# Altium PCB NB2DSK01.PcbDoc (part 6 of 17)
Units mil, origin at the board's own origin, x right, y up, seen from the top; angles counter-clockwise.
Board outline 11815 x 6500.03 mil, 8 copper layers (Top Layer, MidLayer1, MidLayer2, GND, PWR, MidLayer3, MidLayer4, Bottom Layer), stack 74.62 mil thick; 798 components, 1002 nets, 3927 pads, 3182 vias.
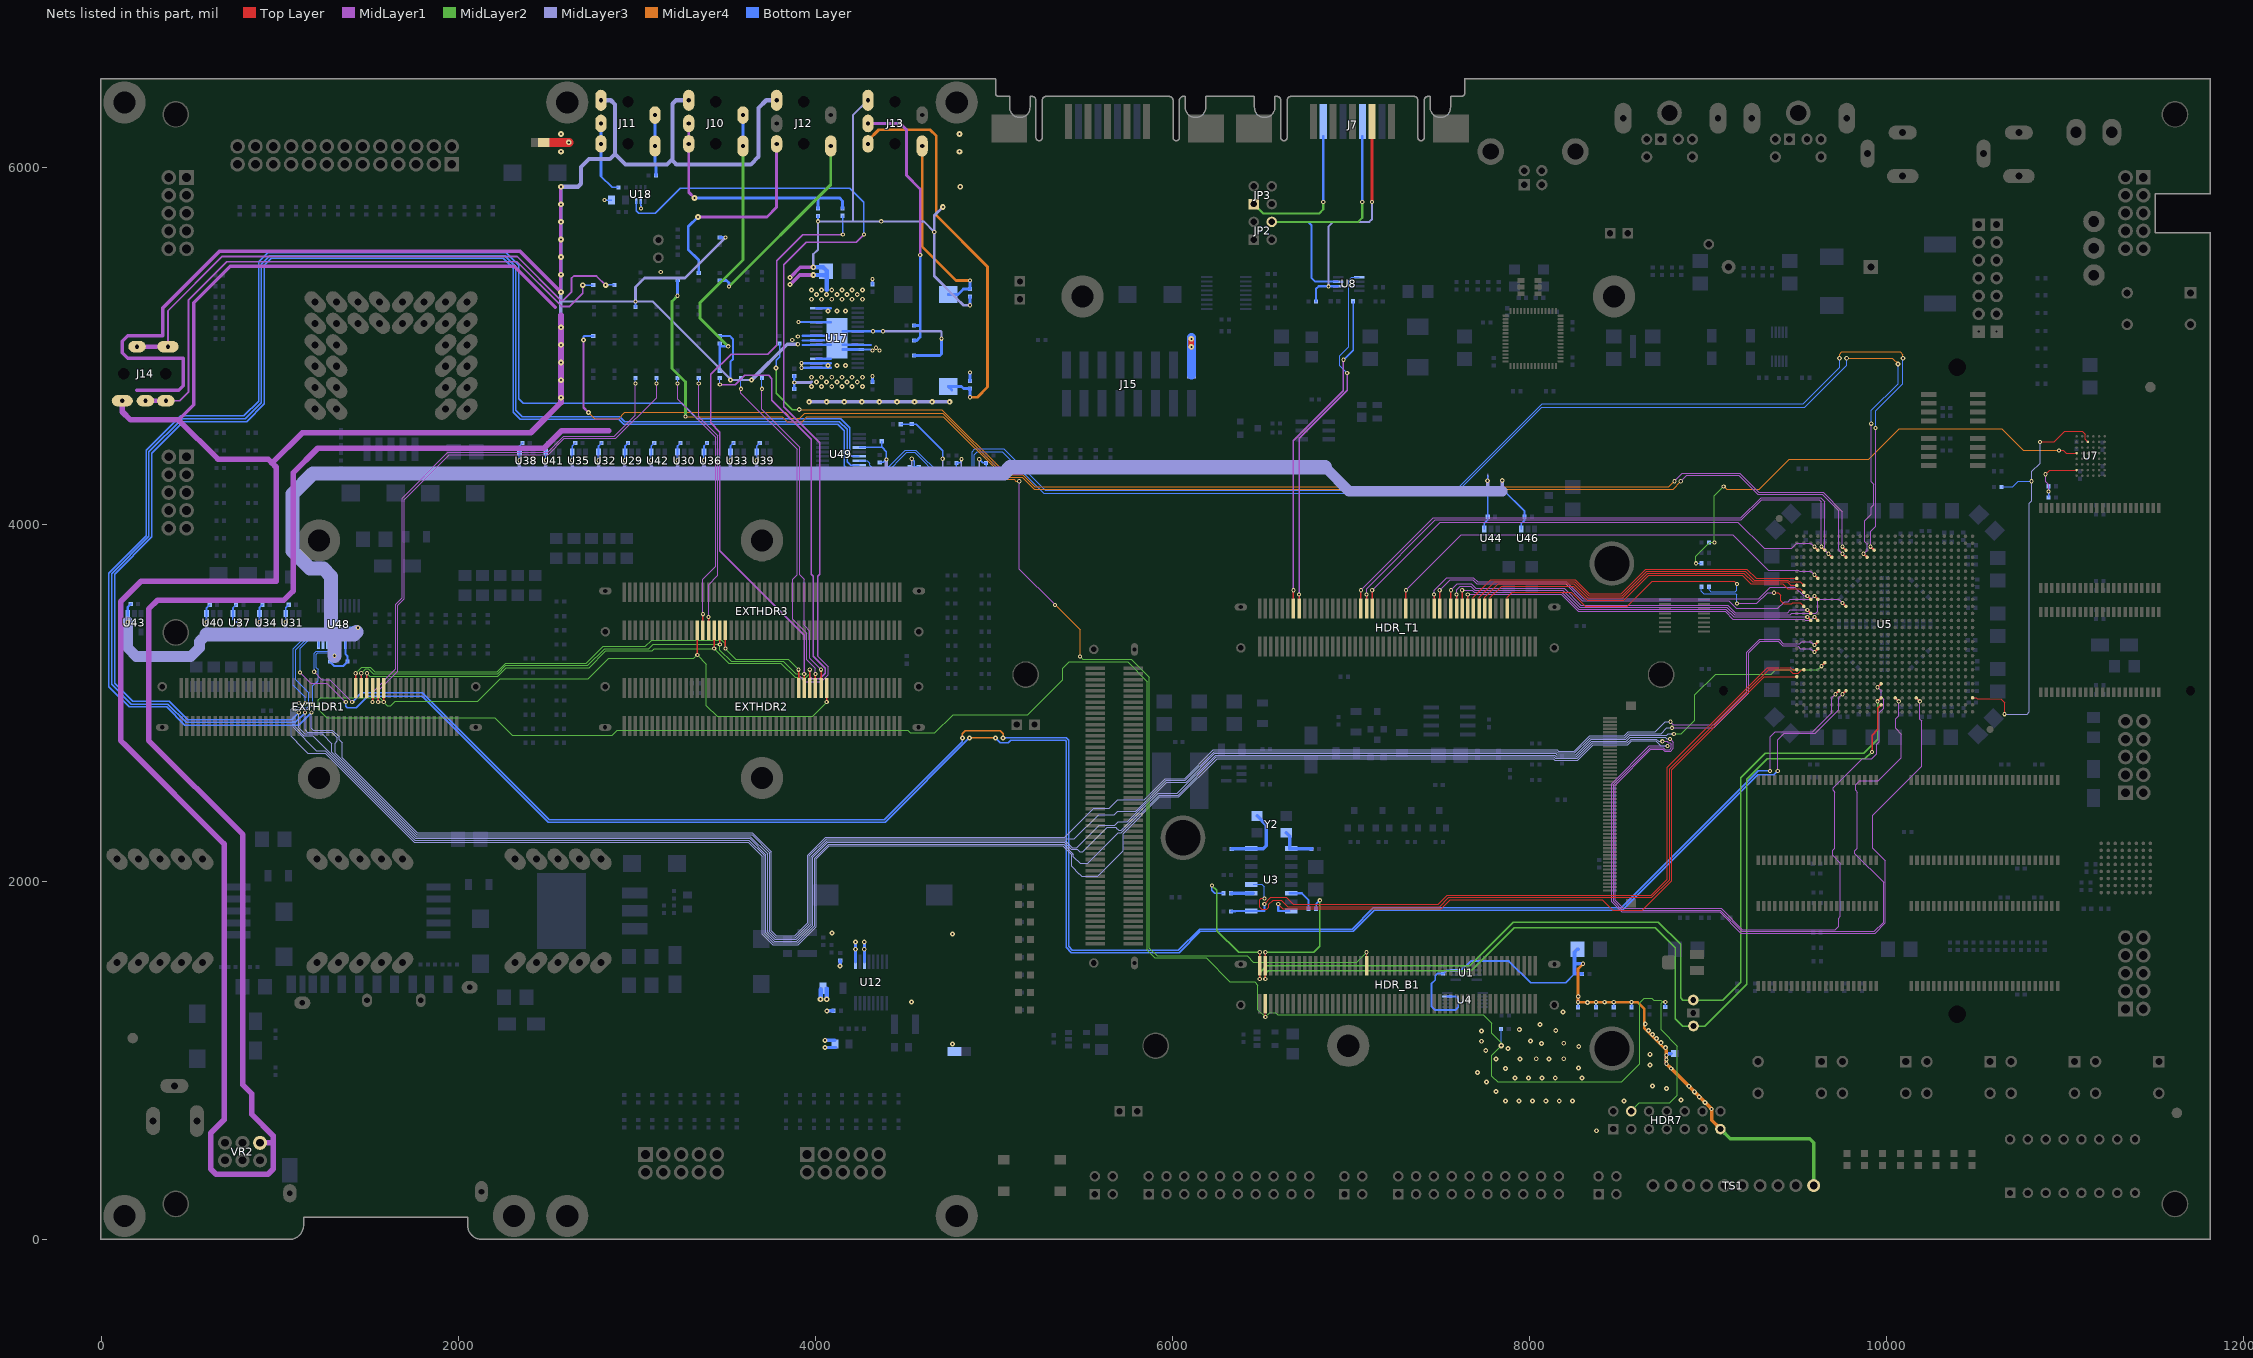
[diagram p12: the nets of this part, all layers, seen from the top]

## Via types
v1: diameter 23.62, hole 11.81, Top Layer to Bottom Layer, tented both sides, 1950 vias
v2: diameter 27.56, hole 11.81, Top Layer to Bottom Layer, tented both sides, 679 vias
v3: diameter 23.62, hole 11.81, Top Layer to Bottom Layer, 194 vias
v4: diameter 31.5, hole 11.81, Top Layer to Bottom Layer, tented both sides, 178 vias
v5: diameter 21.65, hole 11.81, Top Layer to Bottom Layer, tented both sides, 67 vias
v6: diameter 23.62, hole 11.81, Top Layer to Bottom Layer, tented bottom, 53 vias
v7: diameter 26, hole 11.81, Top Layer to Bottom Layer, tented both sides, 21 vias
v8: diameter 26, hole 11.81, Top Layer to Bottom Layer, 13 vias
v9: diameter 28, hole 11.81, Top Layer to Bottom Layer, 8 vias
v10: diameter 25.59, hole 11.81, Top Layer to Bottom Layer, tented both sides, 7 vias
v11: diameter 39.37, hole 11.81, Top Layer to Bottom Layer, tented both sides, 5 vias
v12: diameter 30, hole 11.81, Top Layer to Bottom Layer, 3 vias
v13: diameter 30, hole 11.81, Top Layer to Bottom Layer, tented both sides, 2 vias
v14: diameter 23, hole 11.81, Top Layer to Bottom Layer, tented both sides, 1 vias
v15: diameter 26.56, hole 11.81, Top Layer to Bottom Layer, tented both sides, 1 vias

## Nets (pads, with @x,y where several pads share a name; then routed paths per layer and width w, separated by ;. In a path a pad name is that pad's centre, name@x,y a point inside that pad or via, vN(x,y) a via of type N, cw(c..) or ccw(c..) an arc to the next point about the centre after c; other vN are vias at no path point) (continued)
AD.I2C.SDA: EXTHDR1.27 EXTHDR2.27 EXTHDR3.27 HDR7.4 HDR_B1.3 R7.2 R9.1 | length 15096.9
  Top Layer w5: v1(6519.68,1244.1) HDR_B1.3@6519.68,1318.9
  Top Layer w7.87: v1(1582.68,3007.87) EXTHDR1.27@1582.68,3086.61 ; v1(3338.58,3271.65) EXTHDR3.27@3338.58,3409.45 ; v1(4062.99,3007.87) EXTHDR2.27@4062.99,3086.61
  MidLayer2 w5: v1(4062.99,3007.87) 3984.25,2929.13 3448.82,2929.13 3389.76,2988.19 3389.76,3220.47 v1(3338.58,3271.65) 3318.9,3251.97 2842.52,3251.97 2728.35,3137.8 2236.22,3137.8 2110.24,3011.81 1645.67,3011.81 1622.05,2988.19 1602.36,2988.19 1559.06,3031.5 1228.35,3031.5 1216.54,3019.69 1216.54,2968.5 1264.59,2920.45 2204.68,2920.45 2302.3,2822.84 2862.2,2822.84 2889.76,2850.39 4515.75,2850.39 4531.5,2834.65 4669.29,2834.65 4771.65,2937.01 5188.98,2937.01 5385.83,3133.86 5385.83,3196.85 5421.26,3232.28 5748.03,3232.28 5858.27,3122.05 5858.27,1618.11 5901.58,1574.8 6188.98,1574.8 6321.73,1442.05 6459.52,1442.05 6478.46,1423.11 6478.46,1285.32 v1(6519.68,1244.1) 6543.31,1267.72 6578.74,1267.72 6590.55,1255.91 7738.8,1255.91 7787,1207.71 7787,1154.07 7840.64,1100.43 v4(7840.64,1083.36) ; v4@7840.64,1082 7787,1028.36 7787,913.14 7820.06,880.08 8515.54,880.08 8617,981.54 8617,1324 8642,1349 8684,1349 8694.94,1338.06 8734.08,1338.06 8744.08,1328.06 ; HDR7.4@8568.5,716.54 8614.97,763 8784,763 8826,805 8826,1081.14 8736,1171.14 8736,1319.99 8744.08,1328.06 ; v1(8759.97,1328.06) 8744.08,1328.06
  Bottom Layer w5: v4(7840.64,1083.36) R9.1@7840.64,1177
  Bottom Layer w7.87: R7.2@8759.97,1299.22 v1(8759.97,1328.06)
ADC_GND: C5.2 C6.2 C7.2 C8.2 C9.2 C16.2 C17.2 HDR7.13 NT2.2 TS1.10 U1.7 U4.4 | length 4035.1
  MidLayer2 w19.68: HDR7.13@9068.5,616.54 9123.71,561.33 9568.81,561.33 9590.67,539.47 TS1.10@9590.67,300
  MidLayer4 w15: v1(8299,1542) 8270.97,1513.97 v1(8270.97,1327.04) v1(8370.97,1327.04) v1(8420,1327.04) v1(8470.97,1327.04) v1(8570.97,1327.04) 8602.96,1327.04 8642,1288 8642,1180.22 8765.75,1056.48
  MidLayer4 w19.68: v1(8766,982) v1(8792.43,955.57) v1(9019,729) 9019,666.04 HDR7.13@9068.5,616.54
  MidLayer4 w20: v1@8765.75,982.28 v1(8765.75,1005) v1(8765.75,1030) 8765.75,1056.48
  Bottom Layer w7.87: C5.2@8270.97,1298.19 v1(8270.97,1327.04) ; C6.2@8370.97,1298.19 v1(8370.97,1327.04) ; C7.2@8470.97,1298.19 v1(8470.97,1327.04) ; C8.2@8570.97,1298.19 v1(8570.97,1327.04)
  Bottom Layer w9.84: U4.4@7539.38,1359.06 7585.94,1359.06 7600,1345 7600,1299.34 7583.33,1282.67 7471,1282.67 7450,1303.67 7450,1429.71 7471.31,1451.02 7471.31,1475.45 7483,1487.14 C9.2@7514.54,1487.14 7517.5,1487.14 7535.21,1504.86 U1.7@7586.54,1504.86 7617.86,1504.86 7670,1557 7883.89,1557 8005.41,1435.48 8201.48,1435.48 8251.2,1485.2 ; 8791,1039 NT2.2@8797,1039
  Bottom Layer w19.68: C16.2@8270.89,1623 C16.2@8266.95,1623 8251.2,1607.25 8251.2,1542 ; C17.2@8293.53,1485.2 8251.2,1485.2 8251.2,1542 ; v1(8299,1542) 8251.2,1542
  Bottom Layer w20: v1(8766,982) 8766,1005 8766,1030 8766,1031 8774,1039 8791,1039
  other v2: 8374,607 8982,766 7864.78,773.4 7939.99,773.4 8015.2,773.4 8090.41,773.4 8165.62,773.4 8240.83,773.4 8527.72,773.4 8847,778 8950,796 8923,825 7811.6,826.58 8766,844 8892,856 8687,857 7758.42,879.76 7917.95,902 7993.16,902 8068.37,902 8143.58,902 8294,902 7709,934 7864.77,955.18 8274.22,957.78 8675,975 7811.59,1008.36 7945,1009 8108,1009 8037,1010 8191,1010 8673,1035 7754,1057 7879,1068 8761,1072 8275,1079 8067,1096 8191,1097 8735,1100 7729.76,1108 8005,1110 8711,1123 8688,1147 7729.76,1166.57 8146,1169 8665,1169 7942,1174 8058,1202 8186,1273 8324,1326 8272,1359
  other v15: 8648,1205
AGND: C151.2 C152.1 NT1.1 R69.1 R70.1 U12.9 U12.11 | length 517.6
  Bottom Layer w18: v2(4053.68,1073.45) 4110.31,1073.45 C152.1@4113.68,1073.45 ; v2(4053.68,1113.45) C152.1@4108.68,1113.45 ; v2(4063.68,1278.45) R69.1@4100.5,1278.45 ; v2(4138.68,1528.45) R70.1@4138.68,1560.27 ; U12.9@4224.18,1553.45 4224.18,1623.45 v2@4224.18,1662.95 ; U12.11@4274.18,1553.45 4274.18,1623.45 v2@4274.18,1662.95
  Bottom Layer w25: v4(4028.68,1343.45) C151.2@4028.68,1398.45 ; v4(4063.68,1343.45) 4063.68,1403.45
  other v2: 4768.68,1093.45 4538.68,1328.45 4223.68,1623.45 4273.68,1623.45 4223.68,1663.45 4273.68,1663.45 4768.68,1708.45 4093.68,1713.45
AIN.L: C175.2 EXTHDR3.31 | length 1481.6
  Top Layer w7.87: EXTHDR3.31@3401.57,3409.45 v1(3401.57,3484.25) v1@3401.57,3488.19
  MidLayer1 w5: v1(3346.46,4791.34) 3346.46,4606.3 3452.76,4500 3452.76,3716.54 3401.57,3665.36 v1(3401.57,3484.25)
  Bottom Layer w5: v1(3346.46,4791.34) C175.2@3346.46,4821.85
AIN.R: C185.2 EXTHDR3.29 | length 1529.8
  Top Layer w7.87: EXTHDR3.29@3370.08,3409.45 v1(3370.08,3500)
  MidLayer1 w5: v1(3228.35,4791.34) 3228.35,4704.72 3440.94,4492.13 3440.94,3767.72 3370.08,3696.85 3370.08,3633.86 v1(3370.08,3500)
  Bottom Layer w5: v1(3228.35,4791.34) C185.2@3228.35,4821.85
AOUT_HOST.L: R108.1 U5.D8 | length 8117.3
  Top Layer w7.87: v1(9751.97,3838.58) U5.D8@9771.65,3818.9
  MidLayer1 w5: v1(8846.46,4244.1) 8880.81,4278.45 9170.37,4278.45 9276.82,4172 9639.43,4172 9732.28,4079.14 9732.28,3858.27 v1(9751.97,3838.58)
  MidLayer1 w11.81: v2(2700.79,5035.43) 2700.79,4657.48 v2(2728.35,4629.92)
  MidLayer4 w5: v2(2728.35,4629.92) 2763.78,4594.49 2897.64,4594.49 2933.07,4629.92 3830.71,4629.92 3862.2,4598.43 3913.39,4598.43 3940.95,4625.99 4712.6,4625.99 5070.87,4267.72 5157.48,4267.72 5224.41,4200.79 8803.15,4200.79 v1(8846.46,4244.1)
  Bottom Layer w11.81: v2(2700.79,5035.43) 2700.79,5053.36 2706.01,5058.58 R108.1@2755.91,5058.58
AOUT_HOST.R: R128.1 U5.C8 | length 6821.4
  Top Layer w7.87: v1(9751.97,3877.95) U5.C8@9771.65,3858.27
  MidLayer1 w5: v1(8811.02,4244.1) 8855.38,4288.45 9176.68,4288.45 9209.23,4255.91 9240.16,4224.98 9283.13,4182 9643.57,4182 9751.97,4073.6 v1(9751.97,3877.95)
  MidLayer2 w7.87: v2(3779.53,4877.95) 3779.53,4736.22 3870.08,4645.67 v2(3909.45,4645.67)
  MidLayer4 w5: v2(3909.45,4645.67) 4708.66,4645.67 5074.8,4279.53 5161.42,4279.53 5228.35,4212.6 8779.53,4212.6 v1(8811.02,4244.1)
  Bottom Layer w7.87: v2(3779.53,4877.95) 3779.53,4921.26 3799.21,4940.95 R128.1@3799.21,5016.22
AOUTA.L: C173.2 EXTHDR1.31 | length 2996.2
  Top Layer w7.87: v1(1519.69,3007.87) EXTHDR1.31@1519.69,3086.61
  MidLayer1 w5: v1(1519.69,3007.87) 1519.69,3062.99 1649.61,3192.91 1649.61,3555.12 1685.04,3590.55 1685.04,4149.61 1940.94,4405.51 2500,4405.51 2590.55,4496.06 2874.02,4496.06 2992.13,4614.17 v1(2992.13,4791.34)
  Bottom Layer w5: v1(2992.13,4791.34) C173.2@2992.13,4821.85
AOUTA.R: C184.2 EXTHDR1.29 | length 3032
  Top Layer w7.87: v1(1551.18,3007.87) EXTHDR1.29@1551.18,3086.61
  MidLayer1 w5: v1(1551.18,3007.87) 1551.18,3070.87 1661.42,3181.1 1661.42,3551.18 1696.85,3586.61 1696.85,4141.73 1948.82,4393.7 2503.94,4393.7 2594.49,4484.25 2881.89,4484.25 3110.24,4712.6 v1(3110.24,4791.34)
  Bottom Layer w5: v1(3110.24,4791.34) C184.2@3110.24,4821.85
AOUTB.L: C176.2 EXTHDR2.31 | length 1927.7
  Top Layer w7.87: EXTHDR2.31@4000,3086.61 v1(4000,3165.36)
  MidLayer1 w5: v1(3582.68,4761.81) 3582.68,4737.88 3897.64,4422.92 3897.64,3720.47 3874.02,3696.85 3874.02,3472.44 3952.76,3393.7 3952.76,3244.1 4000,3196.85 v1(4000,3165.36)
  Bottom Layer w5: v1(3582.68,4761.81) C176.2@3582.68,4821.85
AOUTB.R: C186.2 EXTHDR2.29 | length 1873.2
  Top Layer w7.87: EXTHDR2.29@4031.5,3086.61 v1(4031.5,3188.98)
  MidLayer1 w5: v1(3700.79,4761.81) 3700.79,4647.35 3913.39,4434.75 3913.39,3720.47 3937.01,3696.85 3937.01,3437.01 3968.5,3405.51 3968.5,3251.97 v1(4031.5,3188.98)
  Bottom Layer w5: v1(3700.79,4761.81) C186.2@3700.79,4821.85 C186.2@3700.79,4822.84
AOUTC.L: C192.2 EXTHDR1.33 EXTHDR2.33 EXTHDR3.33 | length 5210.3
  Top Layer w7.87: EXTHDR1.33@1488.19,3086.61 v1(1488.19,3169.29) ; v1(3433.07,3307.09) EXTHDR3.33@3433.07,3409.45 ; EXTHDR2.33@3968.5,3086.61 v1(3968.51,3188.98)
  MidLayer1 w5: 3755.8,4698.93 3755.91,4699.04
  MidLayer1 w7.87: v1(3464.57,4785.43) 3551.6,4785.43 3602.87,4836.7 3737.9,4836.7 3755.91,4818.69 3755.91,4699.06 ; 3755.8,4698.93 3976.38,4478.35 3976.38,3724.41 3988.19,3712.6 3988.19,3263.78 4055.12,3196.85 4055.12,3169.29 4023.62,3137.8 3980.32,3137.8 3968.5,3149.61 v1(3968.51,3188.98)
  MidLayer2 w5: v1(1488.19,3169.29) 1503.94,3153.54 2222.08,3153.54 2269.32,3200.79 2732.28,3200.79 2826.77,3295.28 3086.61,3295.28 3098.42,3307.09 v1(3433.07,3307.09) 3515.75,3224.41 3807.09,3224.41 3885.83,3145.67 3948.82,3145.67 3968.51,3165.36 v1(3968.51,3188.98)
  Bottom Layer w5: v1(3464.57,4785.43) C192.2@3464.57,4821.85
AOUTC.MIC: EXTHDR1.37 EXTHDR2.37 EXTHDR3.37 U18.3 | length 7714.6
  Top Layer w7.87: EXTHDR1.37@1425.2,3086.61 v1(1425.2,3169.29) ; v1(3496.06,3307.09) EXTHDR3.37@3496.06,3409.45 ; EXTHDR2.37@3905.51,3086.61 v1(3905.51,3188.98)
  MidLayer1 w5: v1(3905.51,3188.98) 3905.51,3157.48 3940.95,3122.05 4031.5,3122.05 4070.87,3161.42 4070.87,3204.73 4011.81,3263.78
  MidLayer1 w7.87: 4011.81,3263.78 4011.81,3712.6 4023.62,3724.41 4023.62,4460.63 3881.89,4602.36 3822.83,4661.42 3822.83,5456.69 3948.82,5582.68 4228.35,5582.68 v1(4271.65,5625.98)
  MidLayer2 w5: v1(1425.2,3169.29) 1458.91,3203 1505.66,3203 1531.5,3177.17 2217.42,3177.17 2264.66,3224.41 2716.54,3224.41 2811.02,3318.9 3047.24,3318.9 3082.68,3354.33 3476.38,3354.33 3496.06,3334.65 v1(3496.06,3307.09) 3555.12,3248.03 3846.46,3248.03 v1(3905.51,3188.98)
  Bottom Layer w7.87: U18.3@2996.06,5814.96 2996.06,5759.84 3011.81,5744.09 3102.36,5744.09 3244.09,5885.83 4192.91,5885.83 4271.65,5807.09 v1(4271.65,5625.98)
AOUTC.R: C191.2 EXTHDR1.35 EXTHDR2.35 EXTHDR3.35 | length 6241.6
  Top Layer w7.87: EXTHDR1.35@1456.69,3086.62 v1(1456.69,3169.29) ; v1(3464.57,3330.71) EXTHDR3.35@3464.57,3409.45 ; EXTHDR2.35@3937.01,3086.61 v1(3937.01,3165.36)
  MidLayer1 w7.87: v1(3937.01,3165.36) 3937.01,3381.89 3464.57,3854.33 3464.57,4519.69 3413.39,4570.87 3413.39,4842.42 3527.48,4956.52 3734.33,4956.52 3783.46,5005.65 3783.46,5480.32 3929.13,5625.99 v1(4153.54,5625.99)
  MidLayer2 w5: v1(1456.69,3169.29) 1480.32,3192.91 1496.06,3192.91 1523.62,3165.36 2219.75,3165.36 2266.99,3212.6 2724.41,3212.6 2818.9,3307.09 3066.93,3307.09 3090.55,3330.71 v1(3464.57,3330.71) 3464.57,3299.21 3527.56,3236.22 3818.9,3236.22 3889.76,3165.36 v1(3937.01,3165.36)
  Bottom Layer w7.87: v1@4151.97,5627.56 v1(4153.54,5625.99) 4153.54,5674 4151.97,5675.57 C191.2@4151.97,5730.91
AUDIO.AMP_L: C178.2 J14.3 J14.11 | length 3323.6
  MidLayer1 w10: J14.3@362.2,4694.88 440.11,4694.88 488.68,4743.45 488.68,5258.45 703.68,5473.45 2328.68,5473.45 2578.68,5223.45 2623.68,5223.45 2696.85,5296.62 v4(2696.85,5342.52)
  MidLayer1 w23.62: J14.11@236.22,4694.88 J14.11@248.03,4694.88 J14.3@362.2,4694.88
  Bottom Layer w7.87: v4(2696.85,5342.52) C178.2@2755.91,5342.52
AUDIO.AMP_R: C182.2 J14.2 J14.10 | length 3240.4
  MidLayer1 w10: J14.2@374.02,4998.03 374.02,5198.79 678.68,5503.45 2328.68,5503.45 2573.68,5258.45 2588.68,5258.45 2633.68,5303.45 2633.68,5380.98 2646.6,5393.9 2773.42,5393.9 v4(2824.8,5342.52)
  MidLayer1 w23.62: J14.10@188.98,4998.03 J14.10@200.79,4998.03 J14.2@374.02,4998.03
  Bottom Layer w7.87: v4(2824.8,5342.52) 2825.79,5343.5 C182.2@2874.02,5343.5 ; C182.2@2870.68,5338.78 2871.66,5339.76 2873.7,5339.59 C182.2@2874.02,5339.57
AUDIO.HP_L: C177.2 J13.2 R123.2 | length 1093.1
  MidLayer4 w15.75: J13.2@4597.8,6122.05 4597.8,5558.74 4788,5368.54 v1(4866.13,5368.54)
  Bottom Layer w15.75: C177.2@4744.02,5290.38 4798.38,5290.38 4828.38,5320.38 R123.2@4866.13,5320.38 v1(4866.13,5368.54)
AUDIO.HP_R: C180.2 J13.3 R122.2 | length 2291
  MidLayer4 w15.75: J13.3@4294.65,6133.86 4294.65,6152.91 4354.33,6212.6 4641.73,6212.6 4677.17,6177.17 4677.17,5733 4964.57,5445.6 4964.57,4771.65 4907.72,4714.8 v1(4866.13,4714.8)
  Bottom Layer w15.75: C180.2@4744.02,4775.32 4816.68,4775.32 4829.05,4762.95 R122.2@4866.13,4762.95 v1(4866.13,4714.8) ; C180.2@4744.03,4775.3 C180.2@4763.9,4755.43
AUDIO.HP_SENSE: J13.11 R110.1 R111.1 | length 1504.5
  MidLayer1 w15.75: J13.11@4294.65,6240.79 J13.11@4294.65,6248.03 4475.45,6248.03 4510.74,6212.74 4510.74,5957.77 4586.61,5881.89 v1(4586.61,5511.81)
  Bottom Layer w15.75: R110.1@4552.67,5032.72 4567.44,5032.72 4586.61,5051.9 v1(4586.61,5511.81) ; R111.1@4552.67,5117.37 4585.08,5117.37
AUDIO.LIN_L: C192.1 J10.2 J10.10 R134.2 | length 1654.1
  MidLayer2 w15.75: v1(3511.81,5000) 3354.33,5157.48 3354.33,5244.1 3593.86,5483.62 J10.2@3593.86,6122.05
  Bottom Layer w15.75: C192.1@3464.57,4866.14 R134.2@3464.57,5016.22 ; 3467.47,5000 v1(3511.81,5000) ; J10.2@3593.86,6122.05 J10.10@3593.86,6295.28
AUDIO.LIN_R: C191.1 J10.3 J10.11 R133.2 | length 1438
  MidLayer1 w15.75: J10.11@3290.71,6248.03 J10.3@3290.71,6133.86 3290.71,5862.84 v4(3322.83,5830.71)
  Bottom Layer w15.75: J10.3@3290.71,6157.48 J10.3@3290.71,6133.86 J10.3@3290.75,6110.24 ; J10.11@3290.71,6224.41 J10.11@3290.71,6248.03 ; v4(3322.83,5830.71) 4013.28,5830.71 ; R133.2@4014.17,5772.76 4014.17,5829.82 4013.28,5830.71 ; C191.1@4151.97,5772.24 4151.97,5814.66 4135.92,5830.71 4013.28,5830.71
AUDIO.LOUT_L: C190.2 J12.2 | length 1101.3
  MidLayer2 w15.75: v1(3515.75,5334.65) 4085.98,5904.88 J12.2@4085.98,6122.05
  Bottom Layer w15.75: C190.2@3464.57,5369.1 3502.21,5369.1 3515.75,5355.56 v1(3515.75,5334.65)
AUDIO.LOUT_R: C187.1 J12.3 | length 1202.7
  MidLayer1 w15.75: v4(3342.52,5724.41) 3728.35,5724.41 3782.83,5778.9 J12.3@3782.84,6133.86
  Bottom Layer w15.75: v4(3342.52,5724.41) 3287.4,5669.29 3287.4,5542 3346.46,5482.95 C187.1@3346.46,5410.43 ; J12.3@3783.46,6110.24 J12.3@3783.46,6133.86
AUDIO.MIC: C198.1 J11.2 J11.10 | length 340.9
  Bottom Layer w15.75: J11.10@3101.73,6295.28 J11.2@3101.73,6122.05 3101.73,6018.27 3107.28,6012.72 C198.1@3107.28,5956.68
"AUDIO.PARASITE PWR": J11.3 J11.11 R136.2 | length 442.2
  Bottom Layer w7.87: 2798.58,5953.39 2862.2,5889.76 R136.2@2896.14,5889.76
  Bottom Layer w15.75: 2798.58,5953.39 J11.3@2798.58,6133.86 ; J11.3@2798.58,6110.24 J11.3@2798.58,6133.86 ; J11.11@2798.58,6248.03 J11.3@2798.58,6133.86
AUGND: C174.1 C183.2 C193.2 C194.1 C195.1 C196.1 C197.1 J10.1 J11.1 J12.1 J13.1 J14.1 J15.2 NT4.1 pad.0@4120.08,5045.28 R122.1 R123.1 R131.1 R132.2 R133.1 R134.1 U17.1 U17.2 U17.3 U17.6 U17.7 U17.8 U17.11 U17.14 U17.20 U17.23 U17.24 U18.2 VR2.1 | length 36025.4
  Top Layer w30: v4(6105.48,4996.65) v4(6105.48,5041.57)
  Top Layer w50: 2510,6142.3 v4(2618.36,6142.35) v4@2620.13,6142.35
  MidLayer1 w20: 198.68,4753.45 433.68,4753.45 458.68,4778.45 458.68,4933.45 148.68,4933.45 118.68,4963.45 118.68,5028.45 148.68,5058.45 343.68,5058.45 343.68,5213.45 663.68,5533.45 2344.5,5533.45 v4(2574.8,5303.15) v4(2574.8,5401.58) v4(2574.8,5500) v4(2574.8,5598.43) v4(2574.8,5696.85) v4(2574.8,5795.28) v4(2574.8,5893.7) ; 434,4588.77 518.68,4673.45 518.68,5243.45 723.68,5448.45 2313.68,5448.45 2543.68,5218.45 ; v2(3858.27,5346.46) 3911.42,5399.61 v4(3988.19,5399.61) ; v2(3858.27,5385.83) 3915.35,5442.91 v4(3988.19,5442.91)
  MidLayer1 w30: v4(6105.48,4996.65) v4(6105.48,5041.57)
  MidLayer1 w31.5: J14.1@118.11,4694.88 118.11,4633.89 164,4588 434,4588 ; 434,4588.77 434,4588 ; VR2.1@889.76,539.37 963.68,539.37 ; 964.6,539.37 963.68,539.37 ; 2574.8,5174.58 v4(2574.8,5106.3) v4(2574.8,5007.87) v4(2574.8,4909.45) v4(2574.8,4811.02) v4(2574.8,4712.6) 2574.8,4685.04 2405.51,4515.75 1126.39,4515.75 956.82,4346.18 ; 2842.52,4527.56 2579.03,4527.56 2480.6,4429.13 1212.6,4429.13 1074.8,4291.34 1074.8,3629.92 1023.34,3578.45 316.45,3578.45 266,3528 266,2793.06 793.68,2265.37 793.68,863.45 843.68,813.45 843.68,698.45 963.68,578.45 963.68,539.37 ; 434,4588 654,4368 935,4368 956.82,4346.18 ; 956.82,4346.18 980.32,4322.69 980.32,3685.09 224.46,3685.09 109,3569.63 109,2792.57 137.8,2763.78 688.68,2212.89 688.68,668.45 613.68,593.45 613.68,393.45 643.68,363.45 933.68,363.45 963.68,393.45 963.68,539.37
  MidLayer2 w30: v4(6105.48,4996.65) v4(6105.48,5041.57)
  MidLayer4 w30: v4(6105.48,4996.65) v4(6105.48,5041.57)
  MidLayer3 w11.81: v1(4377.95,5084.65) 4703.94,5084.65 4705.71,5082.87 v1(4705.71,5042.77)
  MidLayer3 w12: 2574.8,5250.44 v1(2992.13,5250.51) 3090.07,5250.51 3526.59,4813.99 3529.56,4811.02 v2(3641.73,4811.02) ; v4(3988.19,5442.91) 3988.19,5515.33 4014.17,5541.32 v1(4014.17,5699.88) 4209.89,5699.88 ; J13.1@4294.65,6377.95 4209.89,6293.2 4209.89,5699.88 ; v1(4665.35,5640.55) 4606.02,5699.88 v1(4368.5,5699.88) 4209.89,5699.88
  MidLayer3 w15.75: v1(2992.13,5250.51) 2992.13,5331.7 3042.94,5382.51 3269.01,5382.51 v1(3496.26,5609.76) ; v1(3881.89,4797.24) 3973.43,4797.24 3977.36,4801.18 ; v4(4713.56,5780.51) 4665.35,5732.31 v1(4665.35,5640.55) 4665.35,5393.03 4787.13,5271.25 4828.52,5229.87 v1(4866.13,5229.87)
  MidLayer3 w20: v4(2574.8,4712.6) v4(2574.8,4811.02) v4(2574.8,4909.45) v4(2574.8,5007.87) v4(2574.8,5106.3) 2574.8,5250.44 v4(2574.8,5303.15) v4(2574.8,5401.58) v4(2574.8,5500) v4(2574.8,5598.43) v4(2574.8,5696.85) v4(2574.8,5795.28) v4(2574.8,5893.7) ; v2(3641.73,4811.02) 3842.52,5011.81 v1(3901.57,5011.81) ; v4(3964.57,4688.98) v4(4062.99,4688.98) v4(4161.42,4688.98) v4(4259.84,4688.98) v4(4358.27,4688.98) v4(4456.69,4688.98) v4(4555.12,4688.98) v4(4653.54,4688.98) v4(4751.97,4688.98)
  MidLayer3 w23.62: v4(2574.8,5893.7) 2670,5893.7 2686.7,5910.4 2686.7,6004.7 2731.62,6049.62 2848.76,6049.62 2876.99,6077.84 ; J11.1@2798.58,6377.95 2853.47,6377.95 2876.99,6354.43 2876.99,6077.84 ; J10.1@3290.71,6377.95 3218.47,6377.95 3198.89,6358.37 3198.89,6049.08 ; J12.1@3782.84,6377.95 3724.76,6377.95 3681.93,6335.13 3681.93,6062.08 3638.2,6018.35 3220.95,6018.35 3198.89,6040.41 3198.89,6049.08 ; 2876.99,6077.84 2936.48,6018.35 3168.15,6018.35 3198.89,6049.08
  MidLayer3 w30: v4(6105.48,4996.65) v4(6105.48,5041.57)
  Bottom Layer w7.87: v1(2818.9,5818.9) C197.1@2858.27,5818.9 ; U18.2@3021.65,5814.96 3021.65,5789.37 3023.62,5787.4 v1(3023.62,5771.65)
  Bottom Layer w11.81: v1(3905.51,5135.83) U17.11@4003.94,5135.83 ; 3929.13,5007.87 U17.6@4003.94,5007.87 ; 3929.13,5033.47 U17.7@4003.94,5033.47 ; 3929.13,5059.06 U17.8@4003.94,5059.06 ; U17.24@4236.22,4982.28 v1@4309.06,4982.28 ; U17.23@4236.22,5007.87 4311.02,5007.87 ; U17.20@4236.22,5084.65 v1(4322.83,5084.65) v1(4377.95,5084.65) ; C196.1@4318.9,5347.44 v1(4318.9,5375.99)
  Bottom Layer w12: R132.2@2992.13,5220 v1(2992.13,5250.51) ; R134.1@3464.57,5058.58 3520.01,5058.58 3538.12,5040.48 3538.12,4927.36 3523.62,4912.87 v2(3523.62,4811.02) ; v1(4014.17,5699.88) R133.1@4014.17,5730.39
  Bottom Layer w14.17: v1(3921.26,4879.92) U17.1@4003.94,4879.92 4070.87,4879.92 4086.61,4879.92 ; v1(3921.26,4905.51) U17.2@4003.94,4905.51 4070.87,4905.51 4086.61,4905.51 ; U17.3@4003.94,4931.1 4086.61,4931.1 ; U17.6@4003.94,5007.87 pad.0@4086.61,5007.87 ; U17.7@4003.94,5033.47 pad.0@4086.61,5033.47 ; U17.8@4003.94,5059.06 pad.0@4086.61,5059.06 ; U17.11@4003.94,5135.83 pad.0@4086.61,5135.83 ; U17.14@4003.94,5212.6 4070.87,5212.6 4086.61,5212.6 ; pad.0@4153.54,4982.28 U17.24@4236.22,4982.28 ; pad.0@4153.54,5007.87 U17.23@4236.22,5007.87 ; pad.0@4153.54,5084.65 U17.20@4236.22,5084.65
  Bottom Layer w15.75: R131.1@3464.57,5609.76 v1(3496.26,5609.76) ; C174.1@3881.89,4760.83 v1(3881.89,4797.24) C194.1@3881.89,4833.66 ; C195.1@4318.9,4800.2 v1(4318.9,4832.68) ; C183.2@4552.16,4948.08 4696.59,4948.08 4705.71,4957.19 v1(4705.71,5042.77) ; R122.1@4866.13,4805.32 v1(4866.13,4853.47) ; v1(4866.13,5229.87) R123.1@4866.13,5278.02
  Bottom Layer w23.62: v4(3988.19,5399.61) 4043.31,5399.61 C193.2@4045.28,5397.64 ; v4(3988.19,5442.91) 4043.31,5442.91 4062.01,5424.21 4062.99,5423.23 4062.99,5421.26 4062.99,5314.96
  Bottom Layer w50: J15.2@6105.51,4838.98 v4@6105.51,5049.69
  other v1: 4318.9,4976.38 4358.27,4976.38 4338.58,4992.13 3870.08,5035.43 3901.57,5055.12 3134,5417
  other v2: 3977.36,4775.59 4034.45,4775.59 4091.54,4775.59 4148.62,4775.59 4205.71,4775.59 4262.8,4775.59 4005.91,4801.18 4062.99,4801.18 4120.08,4801.18 4177.17,4801.18 4234.25,4801.18 3977.36,4826.77 4034.45,4826.77 4091.54,4826.77 4148.62,4826.77 4205.71,4826.77 4262.8,4826.77 4070.87,4891.73 4120.09,4891.73 4169.29,4891.73 4070.87,5198.82 4120.09,5198.82 4169.29,5198.82 3977.36,5263.78 4034.45,5263.78 4091.54,5263.78 4148.62,5263.78 4205.71,5263.78 4262.8,5263.78 4005.91,5289.37 4062.99,5289.37 4120.08,5289.37 4177.17,5289.37 4234.25,5289.37 3977.36,5314.96 4034.45,5314.96 4091.54,5314.96 4148.62,5314.96 4205.71,5314.96 4262.8,5314.96
  other v4: 4811.02,5893.7 2574.8,6090.55 4807.09,6090.55 2574.8,6188.98 4807.09,6188.98
BUZZER: HDR_B1.40 R117.1 | length 7271.1
  Top Layer w5: HDR_B1.40@7086.61,1531.5 v1(7086.61,1606.3)
  MidLayer1 w5: v1(5141.73,4244.1) 5141.73,3751.97 v1(5341.81,3551.89)
  MidLayer2 w5: v1(5482.12,3263.11) 5497.77,3247.45 5768.68,3247.45 5870.08,3146.06 5870.08,1629.92 5913.39,1586.61 6417.32,1586.61 6452.76,1551.18 7031.5,1551.18 v1(7086.61,1606.3)
  MidLayer2 w15.75: v1(3228.35,5283.47) 3196.85,5251.97 3196.85,4875.99 3271.65,4801.18 3271.65,4681.1 v1(3271.65,4606.3)
  MidLayer4 w5: v1(3271.65,4606.3) 3814.96,4606.3 3842.52,4578.74 3925.2,4578.74 3952.76,4606.3 4716.54,4606.3 5068.67,4254.16 5113,4254.16 5123.07,4244.1 v1(5141.73,4244.1) ; v1(5341.81,3551.89) 5482.12,3411.59 v1(5482.12,3263.11)
  Bottom Layer w15.75: v1(3228.35,5283.47) R117.1@3228.35,5369.1
CAN#.CAN_H: J7.7 JP2.4 U8.7 | length 1655.2
  MidLayer2 w11.81: JP2.4@6555.12,5696.85 7039.85,5696.85 7062.42,5719.42 v1(7062.42,5808.9)
  Bottom Layer w11.81: JP2.4@6555.12,5696.85 6758.99,5696.85 6779,5676.84 6779,5382 6798.72,5362.28 U8.7@6927,5362.28
  Bottom Layer w15.75: v1(7062.42,5808.9) J7.7@7062.41,6174.79
CAN#.CAN_L: J7.2 R54.2 U8.6 | length 1343.7
  Top Layer w15.75: v1(7116.95,5808.9) J7.2@7117.25,6259.84
  MidLayer3 w11.81: v1(6872.75,5335.85) 6872.75,5669.75 6900,5697 7102,5697 7116.95,5711.95 v1(7116.95,5808.9)
  Bottom Layer w11.81: R54.2@6803.57,5251.05 6803.57,5321.59 6818.67,5336.69 6872.75,5336.69 U8.6@6927,5336.69
CAN.RXD: HDR_T1.14 R53.1 | length 1858.2
  Top Layer w7.87: HDR_T1.14@6677.16,3531.5 v1(6677.16,3633.86)
  MidLayer1 w7.87: v1(6677.16,3633.86) 6677.16,4470.54 6957,4750.37 v1@6957,4925
  Bottom Layer w7.87: v1(6958,4925) 7010.79,4977.79 R53.1@7010.79,5251.96
CAN.TXD: HDR_T1.16 U8.1 | length 2054.2
  Top Layer w7.87: HDR_T1.16@6708.66,3531.5 v1(6708.66,3610.24)
  MidLayer1 w7.87: v1(6708.66,3610.24) 6708.66,4483.82 6978,4753.16 v1(6978,4850)
  Bottom Layer w5: v1(6978,4850) 6936.6,4891.4 6936.6,4946.9 6986.2,4996.5 6986.2,5370.3 7003.77,5387.87 U8.1@7045.11,5387.87
CAN_V+: J7.9 JP3.1 | length 828.2
  MidLayer2 w11.81: JP3.1@6455.12,5796.85 6507.97,5744 6821,5744 6844.31,5767.31 v1(6844.31,5808.9)
  Bottom Layer w15.75: v1(6844.31,5808.9) J7.9@6844.3,6174.79
CCLK: R14.2 U5.AD26 U7.B3 | length 2444
  Top Layer w5: U5.AD26@10480.32,3031.5 10500,3031.5 10506.06,3025.43 10638.19,3025.43 10660,3003.62 v1(10660,2940) ; v1(10858.27,4464.57) 10937.01,4464.57 10996.06,4523.62 11094.49,4523.62 11110.24,4507.87 11110.24,4480.32 U7.B3@11125.98,4464.57
  MidLayer3 w5: v1(10660,2940) 10785.73,2940 10799.21,2953.48 10799.21,4122.05 10811.02,4133.86 v1(10811.02,4244.1) 10811.02,4299.21 10858.27,4346.46 v1(10858.27,4464.57)
  Bottom Layer w5: R14.2@10648.03,4212.21 10704.72,4212.6 10736.22,4244.1 v1(10811.02,4244.1)
CLK_ADJ_X1: C12.1 U3.1 Y2.1 | length 224.8
  Bottom Layer w19.68: Y2.1@6636.62,2275.34 6655.51,2256.44 U3.1@6655.51,2187.01 ; C12.1@6778.54,2185.04 6725.58,2185.04 6723.61,2187.01 U3.1@6665.35,2187.01 U3.1@6657.48,2187.01 ; U3.1@6655.51,2187.01 6657.48,2185.04 U3.1@6657.48,2187.01 ; U3.1@6655.51,2187.01 U3.1@6657.48,2187.01
CLK_ADJ_X2: C13.1 U3.16 Y2.3 | length 391.6
  Bottom Layer w19.68: C13.1@6333.66,2187.01 C13.1@6331.69,2185.04 6369.8,2185.04 6371.77,2187.01 U3.16@6440.95,2187.01 6508.27,2187.01 6524.8,2203.54 6524.8,2319.15 Y2.3@6473.62,2370.34
CLK_FIXED#: R4.2 U3.6 | length 170.7
  Bottom Layer w11.81: U3.6@6655.51,1937.01 U3.6@6665.35,1937.01 6723.58,1937.01 6762.28,1898.3 R4.2@6762.28,1850.39
CLK_PROG#: R3.2 U3.11 | length 122.5
  Bottom Layer w19.68: R3.2@6328.27,1937.01 U3.11@6440.95,1937.01 U3.11@6450.79,1937.01
CLKPLL.CLK_FIXED: HDR_B1.4 R4.1 TP3.1 U5.AE13 | length 6377.4
  Top Layer w7.87: v1(6519.69,1456.69) HDR_B1.4@6519.68,1531.5 v1(6519.69,1606.3) ; v1(9917.32,2728.35) 9917.32,2822.83 9948.82,2854.33 9948.82,2972.44 U5.AE13@9968.5,2992.13
  MidLayer2 w7.87: v1(6519.69,1456.69) 6519.69,1488.19 6535.43,1503.94 7674,1503.94 7915.06,1745 8703,1745 8816,1632 8816,1234 8856.52,1193.48 8981.48,1193.48 9216.54,1428.54 9216.54,2574.8 9330.71,2688.98 9877.95,2688.98 v1(9917.32,2728.35) ; v1(6519.69,1606.3) 6791.34,1606.3 6824.8,1639.76 v1(6824.8,1897.18)
  Bottom Layer w7.87: R4.1@6801.58,1854.33 6804.65,1854.33 R4.1@6804.65,1850.39 6804.65,1877.02 v1(6824.8,1897.18)
CLKPLL.CLK_PROG: HDR_B1.2 R3.1 TP4.1 U5.AD13 | length 6287.3
  Top Layer w7.87: v1(6488.19,1456.69) HDR_B1.2@6488.19,1531.5 v1(6488.19,1606.3) ; v1(9948.82,3011.81) U5.AD13@9968.5,3031.5
  MidLayer2 w7.87: v1(6220.47,1980.32) 6248.03,1952.76 6248.03,1728.35 6370.08,1606.3 v1(6488.19,1606.3) ; v1(6488.19,1456.69) 6488.19,1492.13 6527.56,1531.5 7664.65,1531.5 7908.15,1775 8721,1775 8846,1650 8846,1351 8857.97,1339.03 9081.04,1339.03 9181.1,1439.1 9181.1,2582.68 9318.9,2720.47 9870.08,2720.47 9948.82,2799.21 9948.82,2834.65 ; 9948.82,2834.65 v1(9948.82,3011.81)
  Bottom Layer w7.87: v1(6220.47,1980.32) 6220.47,1952.76 6236.22,1937.01 R3.1@6285.91,1937.01
CLKPLL.CS_N: R5.1 U3.9 U5.Y1 | length 4187.4
  Top Layer w5: v1(6514.17,1876.38) 6551.18,1913.39 6637.8,1913.39 6677.17,1874.02 7488.19,1874.02 7539.37,1925.2 8681.1,1925.2 8771.65,2015.75 8771.65,2641.73 9232.28,3102.36 9330.71,3200.79 9413.39,3200.79 9433.07,3200.79 9460.63,3200.79 9472.44,3188.98 U5.Y1@9496.06,3188.98
  Bottom Layer w5: R5.1@6328.27,1834.65 6354.72,1834.65
  Bottom Layer w11.81: R5.1@6328.27,1834.65 6330.63,1837.01 U3.9@6440.95,1837.01 6514.17,1837.01 v1(6514.17,1876.38)
CLKPLL.DIN: U3.12 U5.Y2 | length 4232.5
  Top Layer w5: v1(6514.4,1908.14) 6497.06,1908.14 6488.19,1899.27 6488.19,1858.27 6500,1846.46 6527.56,1846.46 6539.37,1858.27 6539.37,1874.02 6562.99,1897.64 6610.24,1897.64 6645.67,1862.21 7496.06,1862.21 7547.24,1913.39 8685.04,1913.39 8783.46,2011.81 8783.46,2633.86 9245.23,3095.62 9338.58,3188.98 9413.39,3188.98 9433.07,3188.98 9452.76,3188.98 9472.44,3169.29 9503.94,3169.29 9523.62,3188.98 U5.Y2@9535.43,3188.98
  Bottom Layer w5: U3.12@6450.79,1987.01 6500.15,1987.01 6514.4,1972.76 v1(6514.4,1908.14)
CLKPLL.SCLK: U3.8 U5.AA1 | length 3968.9
  Top Layer w5: v1(6592.13,1876.38) 6618.11,1850.39 7503.94,1850.39 7555.12,1901.58 8405.51,1901.58 8464.57,1842.52 8629.92,1842.52 8795.28,2007.87 8795.28,2629.92 9255.91,3090.55 9314.96,3149.61 9413.39,3149.61 9433.07,3149.61 U5.AA1@9496.06,3149.61
  Bottom Layer w11.81: v1(6592.13,1876.38) 6592.13,1837.01 U3.8@6655.51,1837.01
CONFIG_XCF.PROG: R11.2 R15.2 U7.D1 | length 2751.1
  Top Layer w5: v1(10964.57,4417.32) 10988.19,4417.32 11003.94,4401.58 U7.D1@11062.99,4401.58
  MidLayer2 w5: v1(8931.48,3784.68) 8931.48,3824.18 9009.37,3902.07 v1(9035.09,3902.07) 9035.09,4163.99 v1(9086.6,4215.5)
  MidLayer4 w5: v1(9086.6,4215.5) 9103.12,4198.98 9285.52,4198.98 9452.99,4366.45 9898.68,4366.45 10069.68,4537.45 10643.65,4537.45 10733.35,4447.75 10763.78,4417.32 v1(10964.57,4417.32)
  Bottom Layer w5: v1(8931.48,3784.68) R11.2@8962.1,3784.68 ; R15.2@9004.46,3902.07 v1(9035.09,3902.07)
CONFIG_XCF.TDI: R12.2 R16.2 U7.G1 | length 345.7
  Top Layer w5: v1(10889.76,4283.47) 10913.39,4307.09 U7.G1@11062.99,4307.09
  MidLayer1 w5: v1(10889.76,4283.47) 10889.76,4241.14 10905.98,4224.92 v1@10905.98,4190.65
  Bottom Layer w7.87: R16.2@10905.98,4153.35 v1(10905.98,4187.5) R12.2@10905.98,4216.54
CSGND: C235.2 C236.2 C237.2 C238.2 C239.2 C240.2 C241.2 C242.2 C243.2 C244.2 C245.2 C246.2 C247.2 C248.2 C249.2 C250.2 C252.2 C254.2 C255.2 C256.2 C257.2 C258.1 C259.1 C260.1 C261.1 C262.1 NT6.2 R186.1 R187.1 R188.1 U29.1 U30.1 U31.1 U32.1 U33.1 U34.1 U35.1 U36.1 U37.1 U38.1 U39.1 U40.1 U41.1 U42.1 U43.1 U44.1 U46.1 U48.14 U49.14 | length 14496.2
  MidLayer3 w7.87: 4539.37,4287.4 v1(4539.37,4370.08) ; 4712.6,4291.34 v1(4712.6,4370.08) ; 4817.36,4287.4 v1(4817.36,4368.11) ; 4917.32,4287.4 v1(4917.32,4367.64)
  MidLayer3 w19.68: 590.55,3389.76 v1(590.55,3456.69) ; 771.65,3385.83 v1(771.65,3456.69) ; 885.83,3385.83 v1(885.83,3456.69) ; 1033.46,3391.73 v1(1033.46,3456.69) ; 2342.52,4287.4 v1(2342.52,4362.2) ; 2490.16,4293.31 v1(2490.16,4362.2) ; 2637.8,4287.4 v1(2637.8,4362.2) ; 2785.43,4289.37 v1(2785.43,4362.2) ; 2933.07,4291.34 v1(2933.07,4362.2) ; 3080.71,4289.37 v1(3080.71,4362.2) ; 3228.35,4291.34 v1(3228.35,4362.2) ; 3375.98,4293.31 v1(3375.98,4362.2) ; 3523.62,4287.4 v1(3523.62,4362.2) ; 3671.26,4289.37 v1(3671.26,4362.2) ; 4397.64,4287.4 v1(4397.64,4366.14) ; 7764.76,4189.96 v2(7764.76,4247.05) ; 7846.46,4188.98 v2(7846.46,4248.03)
  MidLayer3 w59.06: 6854.33,4322.83 6988.19,4188.98 7846.46,4188.98
  MidLayer3 w60: v1(148.61,3455.59) 148.61,3311.39 197,3263 502,3263 551,3312 551,3346.28 590.55,3385.83
  MidLayer3 w78.74: 590.55,3385.83 771.65,3385.83 885.83,3385.83 1287.4,3385.83 ; v1(1306,3267) 1306,3371 ; 1430.41,3399.41 1416.83,3385.83 1287.4,3385.83 ; 6854.33,4322.83 5090.55,4322.83 5055.12,4287.4 4917.32,4287.4 3523.62,4287.4 2637.8,4287.4 2342.52,4287.4 1185.04,4287.4 1070.87,4173.23 1070.87,3853.13 1169.33,3754.67 1244.33,3754.67 1287.4,3711.6 1287.4,3385.83
  Bottom Layer w7.87: U49.14@4244.37,4433.46 4373.62,4433.46 4397.64,4409.45 v1(4397.64,4366.14) 4380.91,4349.41 C254.2@4360.24,4349.41 ; 4371.06,4436.02 C257.2@4371.06,4468.5 ; R188.1@4477.87,4562.99 4538.92,4562.99 4563.9,4562.99 4712.6,4414.3 v1(4712.6,4370.08) ; v1(4539.37,4370.08) 4553.1,4356.35 4553.1,4323.82 ; C259.1@4788.39,4303.15 4789.8,4304.57 R187.1@4789.8,4346.93 4811.93,4346.93 4817.36,4352.36 v1(4817.36,4368.11) ; v1(4917.32,4367.64) 4938.03,4346.93 R186.1@4955.22,4346.93 R186.1@4958.66,4346.93 ; C258.1@4955.71,4303.15 R186.1@4955.71,4345.47 ; v2@7765,4247.28 NT6.2@7765,4274.25
  Bottom Layer w10: v1(590.55,3456.69) U40.1@590.55,3503.94 590.55,3536.32 C245.2@607.38,3553.15 ; C242.2@755.02,3553.15 738.19,3536.32 U37.1@738.19,3503.94 738.19,3470.47 751.97,3456.69 v1(771.65,3456.69) ; v1(885.83,3456.69) U34.1@885.83,3503.94 885.83,3536.32 C244.2@902.66,3553.15 ; v1(1033.46,3456.69) U31.1@1033.46,3503.94 1033.46,3536.32 C236.2@1050.3,3553.15 ; v1(2342.52,4362.2) U38.1@2342.52,4409.45 2342.52,4441.83 C252.2@2359.35,4458.66 ; v1(2490.16,4362.2) U41.1@2490.16,4409.45 2490.16,4441.83 C250.2@2506.99,4458.66 ; v1(2637.8,4362.2) U35.1@2637.8,4409.45 2637.8,4441.83 C248.2@2654.63,4458.66 ; v1(2785.43,4362.2) U32.1@2785.43,4409.45 2785.43,4441.83 C243.2@2802.26,4458.66 ; v1(2933.07,4362.2) U29.1@2933.07,4409.45 2933.07,4439.96 2950.84,4457.73 C241.2@2951.77,4458.66 ; v1(3080.71,4362.2) U42.1@3080.71,4409.45 3080.71,4441.83 C249.2@3097.54,4458.66 ; v1(3228.35,4362.2) U30.1@3228.35,4409.45 3228.35,4441.83 C238.2@3245.18,4458.66 ; v1(3375.98,4362.2) U36.1@3375.98,4409.45 3375.98,4441.83 C247.2@3392.82,4458.66 ; v1(3523.62,4362.2) U33.1@3523.62,4409.45 3523.62,4441.83 C239.2@3540.45,4458.66 ; v1(3671.26,4362.2) U39.1@3671.26,4409.45 3671.26,4441.83 C237.2@3688.09,4458.66 ; C261.1@4539.37,4323.82 4553.1,4323.82 C262.1@4578.74,4323.82 ; U44.1@7746.06,3976.38 7746.06,4009.84 7764.76,4028.54 C235.2@7764.76,4045.28 v2(7764.76,4247.05) ; v2(7846.46,4248.03) 7846.46,4200.79 7971.46,4075.79 C240.2@7971.46,4045.28 7971.46,4026.57 7952.76,4007.87 U46.1@7952.76,3976.38
  Bottom Layer w12: v1(148.61,3455.59) U43.1@148.61,3502.9 148.61,3539.9 C246.2@165.55,3556.84 ; v1(1306,3267) 1292,3267 1281.42,3256.42 C255.2@1281.42,3234.1 1305.52,3210 1355.76,3210 C256.2@1379.84,3234.09 1379.84,3265.16 1367.5,3277.5 U48.14@1367.5,3342.24 1367.5,3406.5 1384.76,3423.76 v2(1439,3423.76)
CSSPI_CS1: U5.C12 U49.17 | length 7751.2
  Top Layer w7.87: v1(9909.45,3877.95) U5.C12@9929.13,3858.27
  MidLayer1 w5: v1(9909.45,3877.95) 9909.45,3964.57 9937.01,3992.13 v1(9937.01,4543.31)
  MidLayer4 w5: v2(9736.22,4933.07) 9736.22,4956.69 9748.03,4968.5 10074.8,4968.5 10090.55,4952.76 v2(10090.55,4933.07)
  Bottom Layer w5: U49.17@4244.37,4358.46 4291.14,4358.46 4303.15,4346.46 4303.15,4334.65 4326.77,4311.02 4397.64,4311.02 4503.94,4417.32 4562.99,4417.32 4700.79,4279.53 4870.08,4279.53 4877.95,4287.4 4877.95,4409.45 4893.7,4425.2 5055.12,4425.2 5287.4,4192.91 7586.91,4192.91 8071.17,4677.17 9531.5,4677.17 9736.22,4881.89 v2(9736.22,4933.07) ; v1(9937.01,4543.31) 9937.01,4637.8 10090.55,4791.34 v2(10090.55,4933.07)
CSSPI_CS2: U5.AC7 U48.17 | length 11375.4
  Top Layer w7.87: v1(9712.6,3051.18) U5.AC7@9732.28,3070.87
  MidLayer1 w5: v1(1192.91,3177.17) 1236.22,3133.86 1279.53,3133.86 v1(1405.51,3007.87) ; v1(9346.46,2622.05) 9346.46,2813.91 9375,2842.45 9586.55,2842.45 9692.91,2948.82 9692.91,3031.5 v1(9712.6,3051.18)
  MidLayer4 w7.87: v2(4822.83,2807.09) 4822.83,2830.71 4838.58,2846.46 5035.43,2846.46 5051.18,2830.71 v2(5051.18,2807.09)
  Bottom Layer w5: v1(1192.91,3177.17) 1192.91,3281.91 1203.93,3292.93 1287.43,3292.93 1292.5,3298 U48.17@1292.5,3342.24
  Bottom Layer w7.87: v1(1405.51,3007.87) 1456.69,3059.06 1797.73,3059.06 2509.27,2347.52 4384.43,2347.52 4822.83,2785.92 v2(4822.83,2807.09) ; v2(5051.18,2807.09) 5404.91,2807.09 5418,2794 5418,1639 5439,1618 6032.86,1618 6151.18,1736.31 7006.28,1736.31 7125.28,1855.31 8514.27,1855.31 9281.01,2622.05 v1(9346.46,2622.05)
CSSPI_DIN: U5.U4 U49.18 | length 18989.3
  Top Layer w7.87: v1(9594.49,3287.4) U5.U4@9614.17,3307.09
  MidLayer1 w5: v1(8796.8,2863.4) 9030.36,2863.4 9226.22,3059.26 9226.22,3282.94 9291.54,3348.27 9393.5,3348.27 9418.82,3322.94 9499.9,3322.94 9503.94,3318.9 9515.75,3307.09 9574.8,3307.09 v1(9594.49,3287.4)
  MidLayer3 w5: v1(1141.73,2948.82) 1141.73,2853 1155.03,2839.7 1290.22,2839.7 1322,2807.92 1322,2791.3 1315.32,2784.63 1315.32,2783.32 1310,2778 1310,2722.28 1768.5,2263.78 3645.08,2263.78 3744,2164.86 3744,1722.37 3777.39,1688.98 3888.16,1688.98 3966,1766.82 3966,2145.86 4062.11,2241.97 5450.63,2241.97 5586.61,2377.95 5673.23,2377.95 5692.58,2397.3 5792.72,2397.3 5964.47,2569.06 6071.39,2569.06 6232.49,2730.16 8149.3,2730.16 8156.86,2722.6 8253.74,2722.6 8339.94,2808.8 8533.8,2808.8 8555.71,2830.71 8736.05,2830.71 8768.74,2863.4 v1(8796.8,2863.4)
  Bottom Layer w7.87: v1@1142,2949.09 1086.61,2893.7 476.38,2893.7 374.02,2996.06 169.29,2996.06 59.06,3106.3 59.06,3726.85 267.72,3935.51 267.72,4409.45 452.76,4594.49 807.09,4594.49 897.64,4685.04 897.64,5460.63 944.88,5507.87 2259.84,5507.87 2322.83,5444.88 2322.83,4641.73 2358.27,4606.3 2905.51,4606.3 2933.07,4578.74 4133.86,4578.74 4177.17,4535.43 4177.17,4354.33 4198.03,4333.46 U49.18@4244.37,4333.46
CSSPI_DIN2: U5.AD15 U48.18 | length 14318
  Top Layer w7.87: U5.AD15@10047.24,3031.5 v1(10066.93,3011.81)
  MidLayer1 w5: v1(8743.1,2787.8) 8770.5,2787.8 8777.39,2780.91 8786.29,2780.91 8794.4,2772.8 8794.4,2751.6 8784.3,2741.5 8760.2,2741.5 8749.5,2752.2 8675.24,2752.2 8469.7,2546.66 8469.7,1892.64 8519.34,1843 9068.4,1843 9187.6,1723.8 9930.16,1723.8 9982.2,1775.84 9982.2,1997.6 9821,2158.8 9821,2175.4 9835.7,2190.1 9835.7,2503.1 9826.3,2512.5 9826.3,2545.5 9848.7,2567.9 9953.7,2567.9 10081.9,2696.1 10081.9,2827.55 10049.37,2860.08 10049.37,2913.18 10066.93,2930.74 v1(10066.93,3011.81)
  MidLayer3 w5: v1(1142,3000.6) 1119.6,2978.2 1091.9,2978.2 1075.4,2961.7 1075.4,2865.4 1205.2,2735.6 1254.26,2735.6 1756.08,2233.78 3627.94,2233.78 3713,2148.72 3713,1710.94 3764.97,1658.98 3900.58,1658.98 3996,1754.39 3996,2133.43 4074.54,2211.97 5389.67,2211.97 5445.29,2156.35 5445.29,2141.41 5482.2,2104.5 5525.7,2104.5 5695.8,2274.6 5712.44,2274.6 5924.34,2486.5 6031.26,2486.5 6244.92,2700.16 8136.87,2700.16 ; 8136.2,2700.16 8143.76,2692.6 8266.17,2692.6 8352.37,2778.8 8546.53,2778.8 8568.44,2800.71 8709.19,2800.71 8722.1,2787.8 v1(8743.1,2787.8)
  Bottom Layer w5: v1(1142,3000.6) 1142,3036 1075,3103 1075,3305 1180,3410 1251,3410 1267.5,3393.5 U48.18@1267.5,3342.24
CSSPI_DOUT: U5.W5 U49.19 | length 18846.3
  Top Layer w7.87: v1(9633.86,3208.66) U5.W5@9653.54,3228.35
  MidLayer2 w5: v1(8807.4,2829.5) 8849.99,2829.5 8926,2905.51 8926,3048 9040.89,3162.89 9351.87,3162.89 9377.95,3188.98 9614.17,3188.98 v1(9633.86,3208.66)
  MidLayer3 w5: v1(1106.3,2948.82) 1106.3,2862.79 1139.39,2829.7 1237.23,2829.7 1291.33,2775.6 1291.33,2726.82 1764.36,2253.78 3636.22,2253.78 3733,2157 3733,1719.23 3773.25,1678.98 3892.3,1678.98 3976,1762.68 3976,2141.72 4066.25,2231.97 5397.95,2231.97 5437.01,2192.91 5464.57,2192.91 5590.55,2318.9 5677.17,2318.9 5694.77,2336.5 5746.06,2336.5 5968.61,2559.06 6075.53,2559.06 6236.63,2720.16 8145.16,2720.16 8152.72,2712.6 8257.88,2712.6 8344.08,2798.8 8537.94,2798.8 8559.85,2820.71 8768.25,2820.71 8777.04,2829.5 v1(8807.4,2829.5)
  Bottom Layer w7.87: v1(1106.3,2948.82) 1066.93,2909.45 484.25,2909.45 381.89,3011.81 177.17,3011.81 74.8,3114.17 74.8,3724.39 283.46,3933.05 283.46,4401.57 460.63,4578.74 814.96,4578.74 913.39,4677.17 913.39,5452.76 952.76,5492.13 2251.97,5492.13 2307.09,5437.01 2307.09,4629.92 2346.46,4590.55 2897.64,4590.55 2925.2,4562.99 4125.98,4562.99 4161.42,4527.56 4161.42,4330.71 4183.66,4308.46 U49.19@4244.37,4308.46
CSSPI_DOUT2: U5.AD18 U48.19 | length 14368.6
  Top Layer w7.87: U5.AD18@10165.35,3031.5 v1(10185.04,3011.81)
  MidLayer1 w5: v1(8772.6,2762.2) 8671.1,2762.2 8459.7,2550.8 8459.7,1888.5 8515.2,1833 9064.2,1833 9183.4,1713.8 9934.3,1713.8 9992.2,1771.7 9992.2,2118.1 9921.3,2189 9921.3,2373.5 10194.72,2646.92 10194.72,2902.58 10185.04,2912.26 v1(10185.04,3011.81)
  MidLayer3 w5: v1(1109.3,3001.8) 1095.7,2988.2 1084.8,2988.2 1063.6,2967 1063.6,2815.3 1093.87,2785.03 1093.87,2783.66 1156.1,2721.42 1254.29,2721.42 1751.94,2223.78 3623.79,2223.78 3703,2144.57 3703,1706.8 3760.83,1648.98 3904.73,1648.98 4006,1750.25 4006,2129.29 4078.68,2201.97 5385.53,2201.97 5435.29,2152.21 5435.29,2088.89 ; 5434.65,2088.25 5475.45,2047.45 5476.73,2047.45 5491.08,2033.1 5580.1,2033.1 5722.98,2175.98 5722.98,2271 5928.48,2476.5 6035.4,2476.5 6249.06,2690.16 8132.06,2690.16 8139.62,2682.6 8270.31,2682.6 8356.51,2768.8 8550.68,2768.8 8572.58,2790.71 8705.05,2790.71 8733.56,2762.2 v1(8772.6,2762.2)
  Bottom Layer w5: v1(1109.3,3001.8) 1134.1,2977 1154,2977 1163,2986 1163,3058.96 1089.87,3132.09 1089.87,3301.67 1185.33,3397.13 1233.13,3397.13 1242.5,3387.75 U48.19@1242.5,3342.24
CSSPI_EOC1: U5.D11 U49.20 | length 7686.8
  Top Layer w7.87: v1(9870.08,3838.58) U5.D11@9889.76,3818.9
  MidLayer1 w5: v1(9870.08,3838.58) 9889.76,3858.27 9889.76,3893.7 9877.95,3905.51 9877.95,4023.62 9913.39,4059.06 9913.39,4098 9927.01,4111.62 9927.01,4227.38 9913.39,4241 v1(9913.39,4566.93)
  MidLayer4 w5: v2(9775.59,4933.07) 10031.5,4933.07 v2(10062.99,4901.57)
  Bottom Layer w5: U49.20@4244.37,4283.46 4389.76,4283.46 4511.81,4405.51 4555.12,4405.51 4692.91,4267.72 4874.02,4267.72 4889.76,4283.46 4889.76,4393.7 4905.51,4409.45 5047.24,4409.45 5279.53,4177.17 7586.61,4177.17 8066.93,4657.48 9539.37,4657.48 9775.59,4893.7 v2(9775.59,4933.07) ; v1(9913.39,4566.93) 9913.39,4641.73 10062.99,4791.34 v2(10062.99,4901.57)
CSSPI_EOC2: U5.AC8 U48.20 | length 11520.7
  Top Layer w7.87: v1(9751.97,3051.18) U5.AC8@9771.65,3070.87
  MidLayer1 w5: v1(1114.17,3173.23) 1173.23,3114.17 1263.78,3114.17 v1(1370.08,3007.87) ; v1(9389.76,2622.05) 9389.76,2797.22 9425,2832.45 9600.17,2832.45 9732.28,2964.57 9732.28,3031.5 v1(9751.97,3051.18)
  MidLayer4 w7.87: v2(4862.2,2807.09) v2(5007.87,2807.09)
  Bottom Layer w5: v1(1114.17,3173.23) 1114.17,3307.76 1179.41,3373 1214,3373 1217.5,3369.5 U48.20@1217.5,3342.24
  Bottom Layer w7.87: U48.20@1218,3316 U48.20@1218,3342.24 ; v1(1370.08,3007.87) 1370.08,2984.25 1377.95,2976.38 1429.13,2976.38 1492.13,3039.37 1799.21,3039.37 2503.94,2334.65 4389.76,2334.65 v2(4862.2,2807.09) ; v2(5007.87,2807.09) 5033.96,2781 5081,2781 5094.21,2794.21 5399.58,2794.21 5405.13,2788.67 5405.13,1633.67 5433.67,1605.13 6038.2,1605.13 6156.51,1723.44 7011.61,1723.44 7130.61,1842.43 8519.6,1842.43 9277.37,2600.2 9367.92,2600.2 v1(9389.76,2622.05)
CSSPI_SCLK: U5.T4 U49.16 | length 18980.1
  Top Layer w7.87: v1(9594.49,3326.77) U5.T4@9614.17,3346.46
  MidLayer1 w5: v1(8788.5,2897.3) 8804.84,2880.96 9033.77,2880.96 9216.22,3063.4 9216.22,3287.09 9287.4,3358.27 9397.64,3358.27 9421.26,3334.65 9511.81,3334.65 9523.62,3346.46 9574.8,3346.46 v1(9594.49,3326.77)
  MidLayer3 w5: v1(1177.17,2948.82) 1177.17,2861 1188.47,2849.7 1294.36,2849.7 1332,2812.06 1332,2798 1351,2779 1351,2695.43 1770.84,2275.59 3647.41,2275.59 3754,2169 3754,1726.51 3781.54,1698.98 3884.02,1698.98 3956,1770.96 3956,2150 4057.97,2251.97 5397.64,2251.97 5559.06,2413.39 5645.67,2413.39 5692.78,2460.5 5841.77,2460.5 5960.33,2579.06 6067.24,2579.06 6228.35,2740.16 8153.44,2740.16 8161,2732.6 8249.6,2732.6 8335.8,2818.8 8529.66,2818.8 8551.57,2840.71 8704.1,2840.71 8760.69,2897.3 v1(8788.5,2897.3)
  Bottom Layer w7.87: v1(1177.17,2948.82) 1106.3,2877.95 468.5,2877.95 366.14,2980.32 157.48,2980.32 43.31,3094.49 43.31,3729.31 251.97,3937.97 251.97,4417.32 444.88,4610.24 799.21,4610.24 881.89,4692.91 881.89,5472.44 933.07,5523.62 2267.72,5523.62 2338.58,5452.76 2338.58,4707.5 2363.58,4682.5 3250.57,4682.5 3338.58,4594.49 4141.73,4594.49 4192.91,4543.31 4192.91,4392.91 4202.36,4383.46 U49.16@4244.37,4383.46
CSSPI_SCLK2: U5.AB13 U48.16 | length 13897.5
  Top Layer w7.87: v1(9948.82,3090.55) U5.AB13@9968.5,3110.24
  MidLayer1 w5: v1(8786.1,2801.1) 8805.6,2781.6 8805.6,2748 8789.1,2731.5 8756.06,2731.5 8745.36,2742.2 8679.38,2742.2 8479.7,2542.52 8479.7,1896.78 8523.48,1853 9072.54,1853 9191.74,1733.8 9712.4,1733.8 9730.1,1751.5 9730.1,1797.1 9740.1,1807.1 9740.1,2105.2 9696.4,2148.9 9696.4,2176.73 9709.4,2189.73 9709.4,2501.84 9705.93,2505.31 9705.93,2506.98 9700.39,2512.52 9700.39,2528.77 9862.92,2691.3 9915.4,2691.3 9942.62,2718.52 9942.62,2771 9957.01,2785.39 9957.01,2948.41 9982.7,2974.1 9982.7,3022.2 9968.3,3036.6 9968.3,3071.07 v1(9948.82,3090.55)
  MidLayer3 w5: v1(1185,2994) 1159.2,2968.2 1096.6,2968.2 1086,2957.6 1086,2868.94 1135.24,2819.7 1184.3,2819.7 1760.22,2243.78 3632.08,2243.78 3723,2152.86 3723,1715.09 3737.84,1700.24 3769.11,1668.98 3896.44,1668.98 3986,1758.53 3986,2137.57 4070.4,2221.97 5393.81,2221.97 5433.28,2182.5 5467.3,2182.5 5481.5,2168.3 5497.4,2168.3 5634.4,2305.3 5682.2,2305.3 5688.16,2299.34 5689.43,2299.34 5700.07,2288.7 5712.4,2288.7 5920.2,2496.5 6027.12,2496.5 6240.77,2710.16 8141.02,2710.16 8148.57,2702.6 8262.03,2702.6 8348.23,2788.8 8542.39,2788.8 8564.3,2810.71 8758.1,2810.71 8767.71,2801.1 v1(8786.1,2801.1)
  Bottom Layer w5: v1(1185,2994) 1185,3098.39 1215,3128.39 1215,3191 1205.79,3200.21 1205.79,3275.79 1212.93,3282.93 1295.09,3282.93 1300.16,3288 1312,3288 1317.5,3293.5 U48.16@1317.5,3342.24
DAU_CLK.FPGA_CLK1: HDR_T1.90 R17.2 | length 1675.9
  Top Layer w5: HDR_T1.90@7874.02,3531.5 7874.02,3594.49 7901.58,3622.05 8232.28,3622.05 8311.02,3543.31 8545.53,3543.31 8686.95,3684.72 9145.28,3684.72 v1(9161,3669)
  Bottom Layer w5: R17.2@9004.46,3653.54 9004.46,3636 9015.46,3625 9151,3625 9161,3635 v1(9161,3669)
DAU_FPGA_CLK1: R17.1 U5.L2 | length 733.5
  Top Layer w5: v1(9368,3620) 9392,3620 9406,3606 9406,3576.13 9423.68,3558.45 9468.68,3558.45 9473.68,3563.45 9515.29,3563.45 U5.L2@9535.43,3543.31
  MidLayer1 w5: v1(9161,3560) 9273,3560 9333,3620 v1(9368,3620)
  Bottom Layer w5: R17.1@8962.1,3653.54 8962.1,3627.9 8975,3615 9154,3615 9161,3608 v1(9161,3560)
DAU_JTAG.HARD.TCK: HDR_T1.72 U5.L8 | length 2449.2
  Top Layer w7.87: HDR_T1.72@7590.55,3531.5 v1(7590.55,3610.24) ; v1(9751.97,3562.99) U5.L8@9771.65,3543.31
  MidLayer1 w5: v1(7590.55,3610.24) 7590.55,3637.8 7610.24,3657.48 7669.29,3657.48 7692.91,3633.86 8185.04,3633.86 8279.53,3539.37 9104.27,3539.37 9147.58,3496.06 9413.39,3496.06 9433.07,3496.06 9460.63,3496.06 9468.5,3503.94 9602.36,3503.94 9614.17,3515.75 9614.17,3574.8 9622.05,3582.68 9732.28,3582.68 v1(9751.97,3562.99)
DAU_JTAG.HARD.TDI: HDR_T1.78 U5.G1 | length 2025.2
  Top Layer w5: HDR_T1.78@7685.04,3531.5 7685.04,3594.49 7783.47,3692.91 8255.91,3692.91 8334.65,3614.17 8513.4,3614.17 8650.68,3751.45 9217.05,3751.45 9267.72,3700.79 U5.G1@9496.06,3700.79
DAU_JTAG.HARD.TDO: HDR_T1.54 U5.G4 | length 2615.8
  Top Layer w7.87: HDR_T1.54@7307.09,3555.12 v1(7307.09,3633.86) ; v1(9594.49,3720.47) U5.G4@9614.17,3700.79
  MidLayer1 w5: v1(7307.09,3633.86) 7618.11,3944.88 9137.8,3944.88 9336.22,3746.45 9505.26,3746.45 9511.55,3740.16 9574.8,3740.16 v1(9594.49,3720.47)
DAU_JTAG.HARD.TMS: HDR_T1.70 U5.M3 | length 2214.2
  Top Layer w7.87: HDR_T1.70@7559.06,3531.5 v1(7559.06,3633.86) ; v1(9555.12,3523.62) U5.M3@9574.8,3503.94
  MidLayer1 w5: v1(7559.06,3633.86) 7594.38,3669.19 7673.33,3669.19 7696.85,3645.67 8192.91,3645.67 8287.4,3551.18 9109.17,3551.18 9152.47,3507.87 9413.39,3507.87 9433.07,3507.87 9444.88,3507.87 9460.63,3523.62 v1(9555.12,3523.62)
DAU_JTAG.SOFT.TCK: HDR_T1.82 U5.H1 | length 1960.3
  Top Layer w5: HDR_T1.82@7748.03,3531.5 7748.03,3594.49 7822.84,3669.29 8248.03,3669.29 8326.77,3590.55 8521.78,3590.55 8660.68,3729.45 9199.68,3729.45 9248.35,3680.79 9441.9,3680.79 9461.27,3661.42 U5.H1@9496.06,3661.42
DAU_JTAG.SOFT.TDI: HDR_T1.84 U5.J2 | length 1975.4
  Top Layer w5: HDR_T1.84@7779.53,3531.5 7779.53,3594.49 7842.52,3657.48 8244.09,3657.48 8322.83,3578.74 8527.88,3578.74 8667.59,3718.45 9191,3718.45 9238.66,3670.79 9417.42,3670.79 9446.47,3641.73 9515.75,3641.73 U5.J2@9535.43,3622.05
DAU_JTAG.SOFT.TDO: HDR_T1.76 U5.N4 | length 2116
  Top Layer w7.87: HDR_T1.76@7653.54,3531.5 v1(7653.54,3610.24) ; v1(9594.49,3484.25) U5.N4@9614.17,3464.57
  MidLayer1 w5: v1(7653.54,3610.24) 8177.17,3610.24 8271.65,3515.75 9094.49,3515.75 9137.8,3472.44 9413.39,3472.44 9433.07,3472.44 9535.43,3472.44 9543.31,3464.57 9574.8,3464.57 v1(9594.49,3484.25)
DAU_JTAG.SOFT.TMS: HDR_T1.80 U5.H2 | length 2040.3
  Top Layer w5: HDR_T1.80@7716.54,3531.5 7716.54,3594.49 7803.15,3681.1 8251.97,3681.1 8330.71,3602.36 8517.59,3602.36 8655.68,3740.45 9208.37,3740.45 9258.03,3690.79 9446.05,3690.79 9455.73,3681.1 9515.75,3681.1 U5.H2@9535.43,3661.42
DAU_PROG.CCLK: HDR_T1.66 U5.K4 | length 2348.5
  Top Layer w7.87: HDR_T1.66@7496.06,3531.5 v1(7496.06,3633.86) ; v1(9594.49,3602.36) U5.K4@9614.17,3582.68
  MidLayer1 w5: v1(7496.06,3633.86) 7555.12,3692.91 7681.1,3692.91 7704.72,3669.29 8200.79,3669.29 8295.28,3574.8 9113.83,3574.8 9156.18,3532.45 9389.57,3532.45 9427.98,3570.87 9448.82,3570.87 9460.63,3582.68 9574.8,3582.68 v1(9594.49,3602.36)
DAU_PROG.DIN: HDR_T1.64 U5.K3 | length 2345.9
  Top Layer w7.87: HDR_T1.64@7464.57,3531.5 v1(7464.57,3610.24) ; v1(9555.12,3602.36) U5.K3@9574.8,3582.68
  MidLayer1 w5: v1(7464.57,3610.24) 7464.57,3633.86 7535.43,3704.73 7685.04,3704.73 7708.66,3681.1 8204.72,3681.1 8299.21,3586.61 9283.46,3586.61 9347.95,3651.1 9486.03,3651.1 9534.77,3602.36 v1(9555.12,3602.36)
DAU_PROG.DONE: HDR_T1.74 U5.N3 | length 2125.2
  Top Layer w7.87: HDR_T1.74@7622.05,3531.5 v1(7622.05,3633.86) ; v1(9555.12,3484.25) U5.N3@9574.8,3464.57
  MidLayer1 w5: v1(7622.05,3633.86) 7677.17,3633.86 7688.98,3622.05 8181.1,3622.05 8275.59,3527.56 9099.38,3527.56 9142.69,3484.25 9413.39,3484.25 9433.07,3484.25 v1(9555.12,3484.25)
DAU_PROG.ID0: HDR_T1.42 U5.C4 | length 2846.2
  Top Layer w7.87: HDR_T1.42@7118.11,3531.5 v1(7118.11,3633.86) ; v1(9594.49,3877.95) U5.C4@9614.17,3858.27
  MidLayer1 w5: v1(7118.11,3633.86) 7500,4015.75 9165.35,4015.75 9312.83,3868.27 9466.63,3868.27 9496,3897.64 9574.8,3897.64 v1(9594.49,3877.95)
DAU_PROG.ID1: HDR_T1.40 U5.C5 | length 3150
  Top Layer w7.87: HDR_T1.40@7086.61,3531.5 v1(7086.61,3610.24) ; v1(9633.86,3877.95) U5.C5@9653.54,3858.27
  MidLayer1 w5: v1(7086.61,3610.24) 7086.61,3641.73 7472.44,4027.56 9185.76,4027.56 9300.2,4142 9622.6,4142 9633.86,4130.74 v1(9633.86,3877.95)
DAU_PROG.ID2: HDR_T1.38 U5.D6 | length 3251.7
  Top Layer w7.87: HDR_T1.38@7055.12,3531.5 v1(7055.12,3633.86) ; v1(9673.23,3838.58) U5.D6@9692.91,3818.9
  MidLayer1 w5: v1(7055.12,3633.86) 7460.63,4039.37 9183.43,4039.37 9296.06,4152 9631.14,4152 9653.54,4129.6 9653.54,3858.27 v1(9673.23,3838.58)